# Altium PCB Drone_PCB.PcbDoc
Units mil, origin at the board's own origin, x right, y up, seen from the top; angles counter-clockwise.
Board outline 1377.95 x 1377.95 mil, 2 copper layers (Top Layer, Bottom Layer); 48 components, 24 nets, 170 pads, 30 vias.
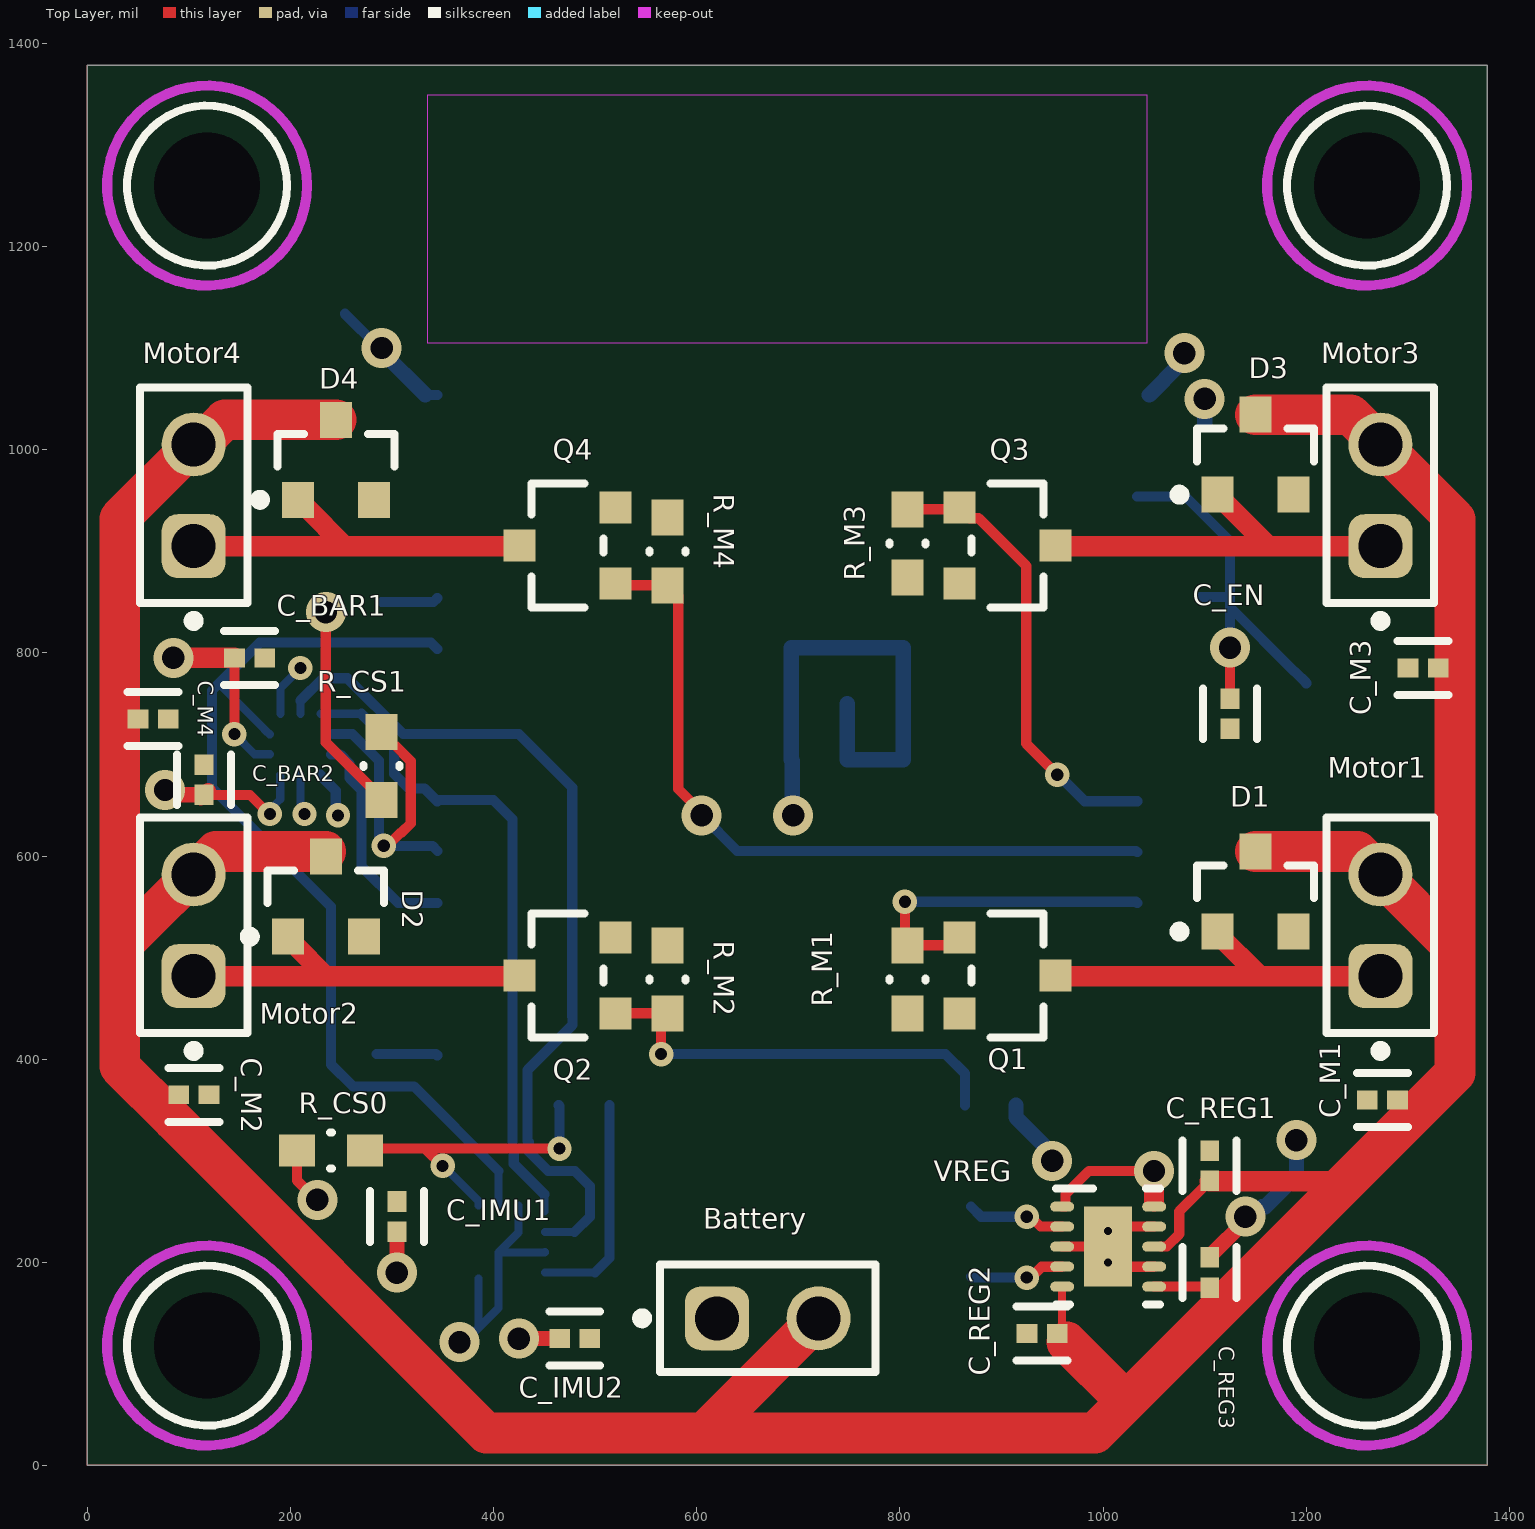
[diagram p0: Top Layer view]
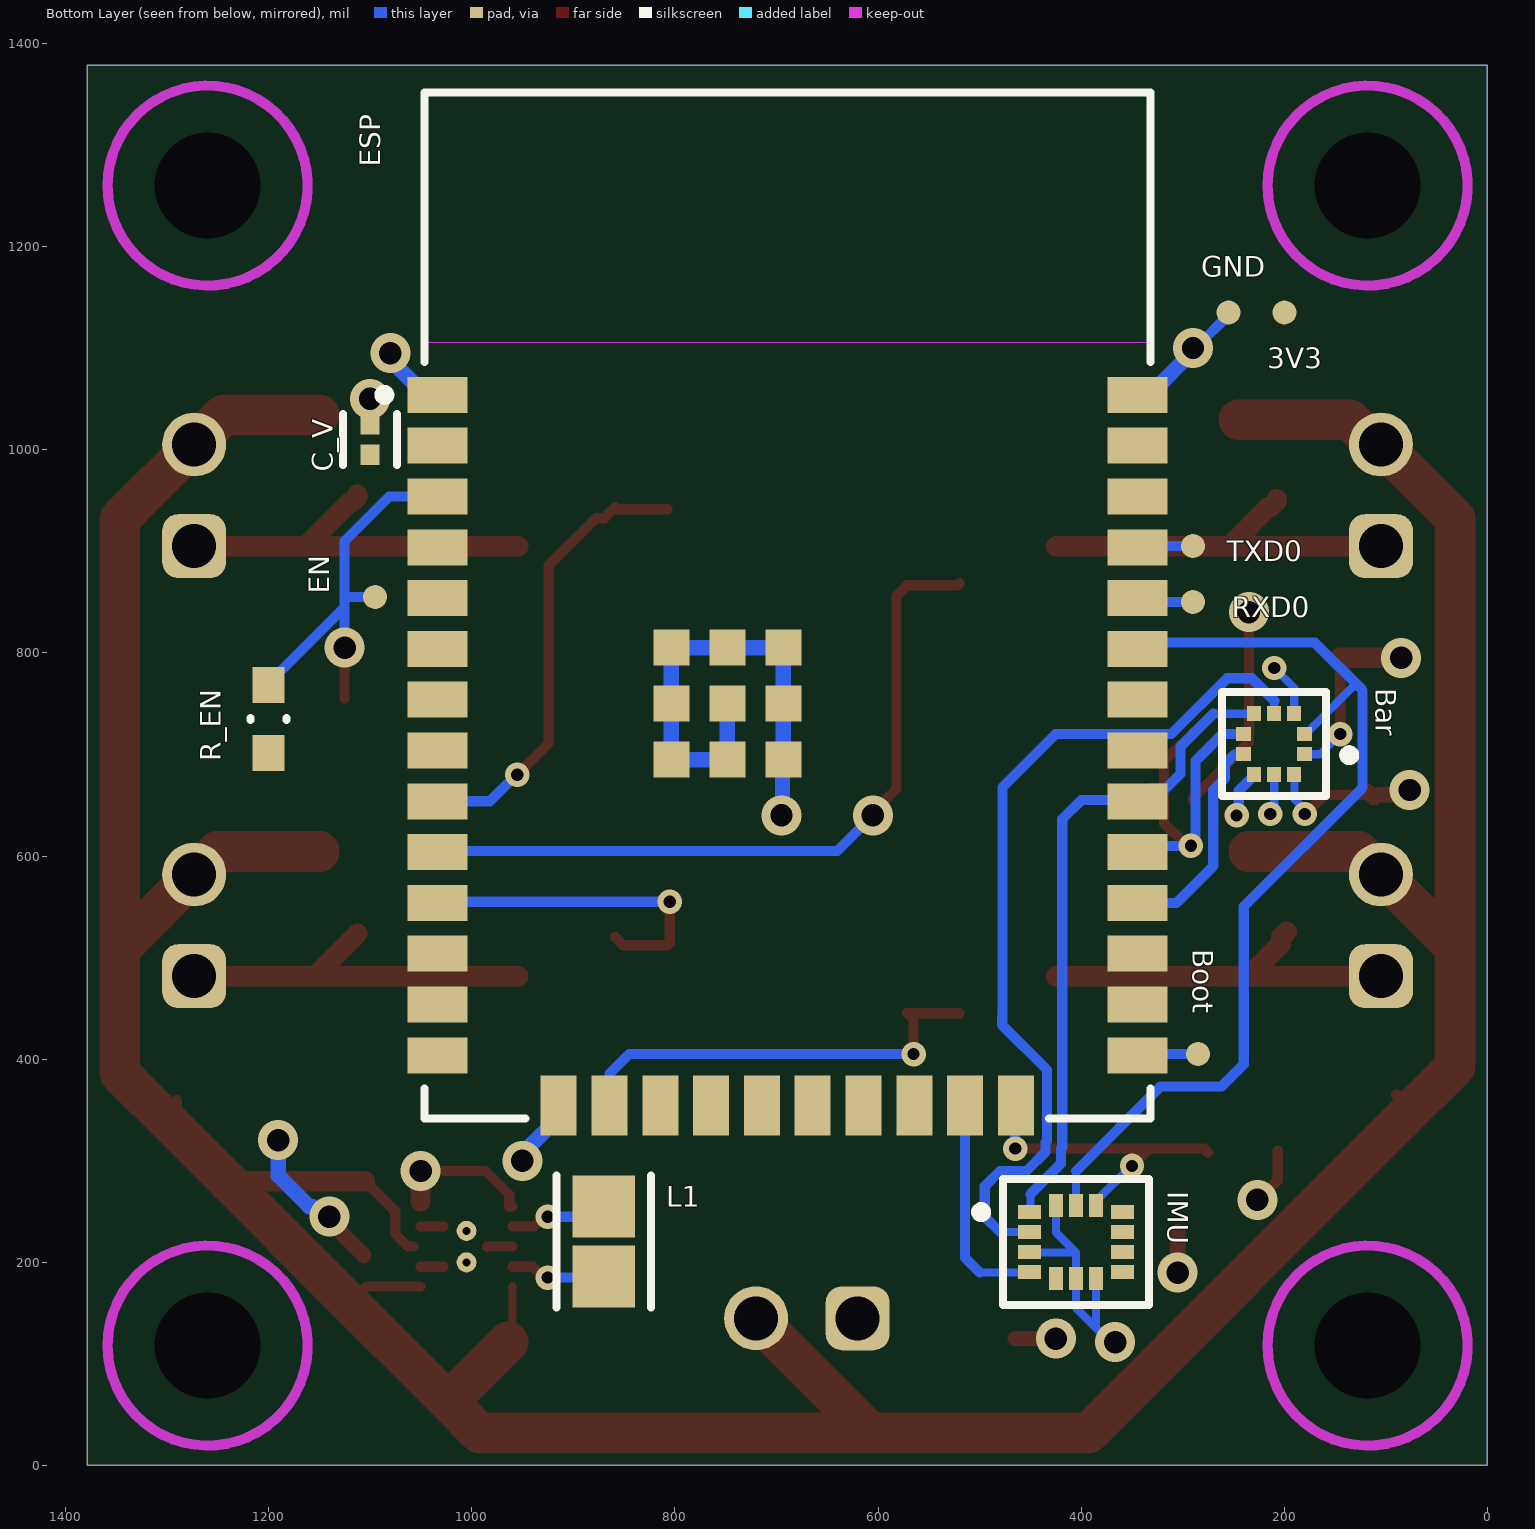
[diagram p1: Bottom Layer view, seen from below]
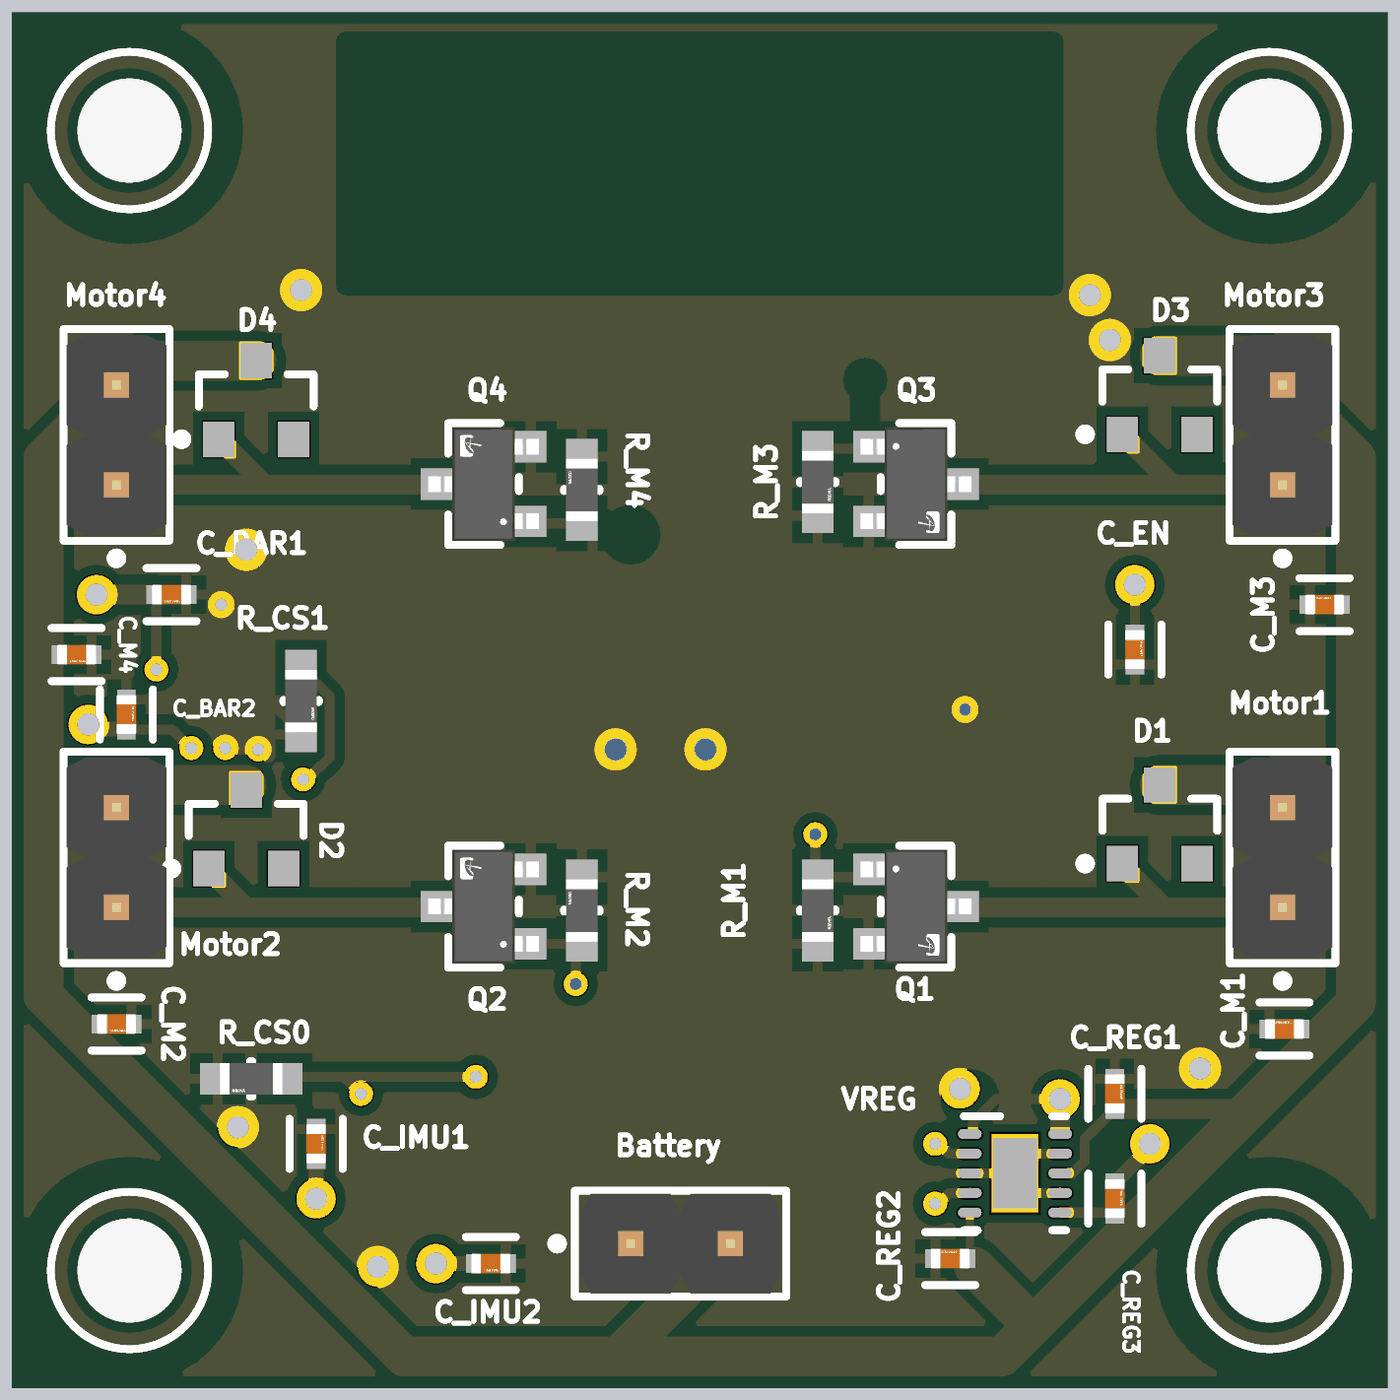
[diagram p2: 3D render of the assembled board from above, using the file's embedded part models]
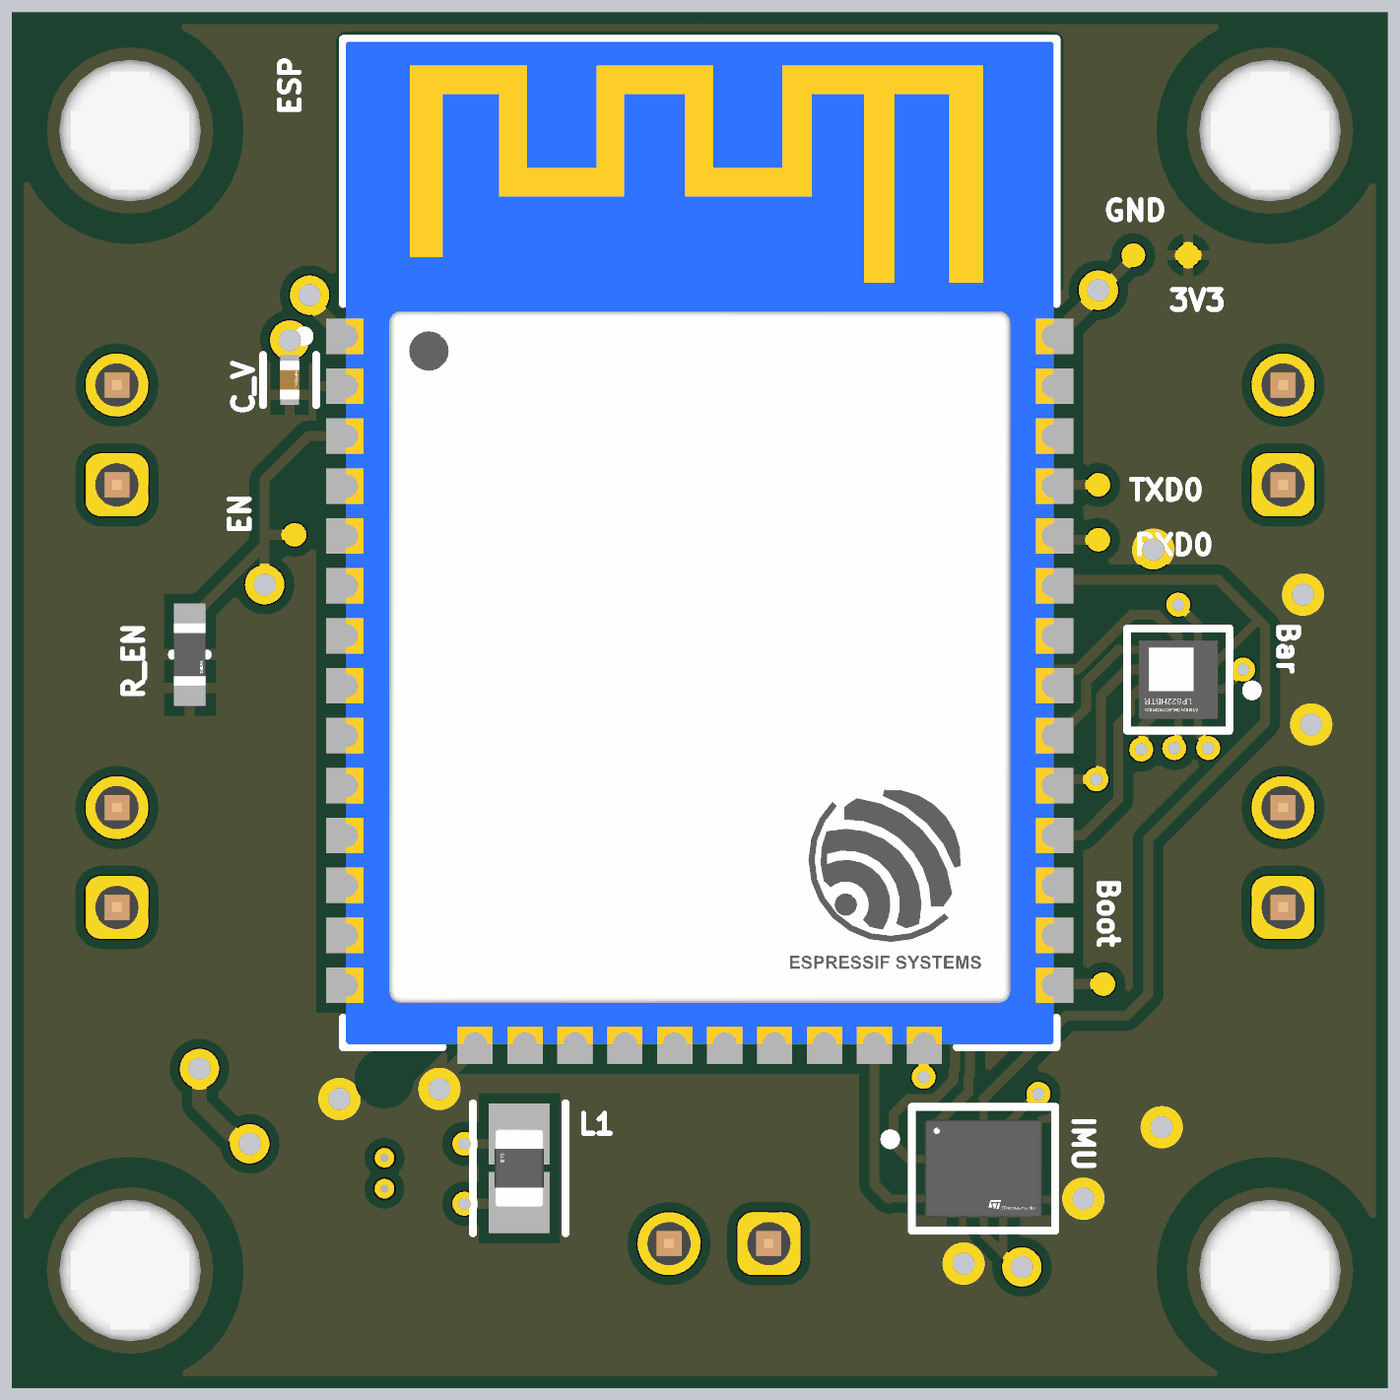
[diagram p3: 3D render of the assembled board from below, using the file's embedded part models]

## Layer stack, top to bottom
Top Solder: solder mask 0.4, Solder Resist, Dk 3.5
Top Layer: signal copper 1.4
Dielectric 1: dielectric 12.6, FR-4, Dk 4.8
Bottom Layer: signal copper 1.4
Bottom Solder: solder mask 0.4, Solder Resist, Dk 3.5

## Board outline
0.28,0.28 0.28,1378.23 1378.23,1378.23 1378.23,0.28

## Design rules (kind name [scope] priority, off if disabled: settings)
BoardOutlineClearance [All] p1: gap=11.81 ignorepadtopadclearanceinfootprint=FALSE
Clearance [All] p1: gap=5 ignorepadtopadclearanceinfootprint=TRUE except(0: Arc-Hole Track-Hole SMDPad-Hole THPad-Hole Via-Hole Fill-Hole Poly-Hole Region-Hole Text-Hole; 7.87: Arc-SMDPad Arc-THPad Track-SMDPad Track-THPad; 10: Via-Via)
Creepage [All] p1: checkdistance=10 applytopolygonpour=TRUE
HoleSize [All] p1: absolutevalues=TRUE maxlimit=248.03 minlimit=5.91 maxpercent=80.000 minpercent=20.000
MinimumAnnularRing [All] p1: minimumring=11.81
MinimumSolderMaskSliver [All] p1: minsoldermaskwidth=5.12
PlaneConnect [All] p1: pad.planeconnectstyle=Relief pad.reliefexpansion=20 pad.reliefentries=4 pad.reliefconductorwidth=10 pad.reliefairgap=10 via.planeconnectstyle=Direct via.reliefexpansion=20 via.reliefentries=4 via.reliefconductorwidth=10 via.reliefairgap=10
PolygonConnect [All] p1: thpad.connectstyle=Relief thpad.reliefconductorwidth=10 thpad.reliefentries=4 thpad.polygonreliefangle="90 Angle" thpad.airgapwidth=10 smdpad.connectstyle=Relief smdpad.reliefconductorwidth=10 smdpad.reliefentries=4 smdpad.polygonreliefangle="90 Angle" smdpad.airgapwidth=10 via.connectstyle=Direct via.reliefconductorwidth=10 via.reliefentries=4 via.polygonreliefangle="90 Angle" via.airgapwidth=10
RoutingVias [All] p1: holewidth=22.05 width=39.37 viastyle="Through Hole" minholewidth=7.87 minwidth=19.68 maxholewidth=248.03 maxwidth=275.59
SilkToSilkClearance [All] p1: silktosilkclearance=0
SilkToSolderMaskClearance [IsPad] p1: minsilkscreentomaskgap=5.91 clearancetoexposedcopper=TRUE
SolderMaskExpansion [All] p1: expansion=1.5 istentingtop=FALSE
UnConnectedPin [All] p1:
UnRoutedNet [All] p1: checkbadconnections=TRUE
Width [All] p1: maxlimit=50 minlimit=5 preferedwidth=10 minimp=50.000000 maximp=50.000000 favimp=50.000000
24 further rules are at their usual default settings.

## Classes and differential pairs
component class Drone_PCB: 3 Bar Battery C_BAR1 C_BAR2 C_EN C_IMU1 C_IMU2 C_M1 C_M2 C_M3 C_M4 C_REG1 C_REG2 C_REG3 C_V D1 D2 D3 D4 ESP IMU l L1 Motor1 Motor2 Motor3 Motor4 Q1 Q2 Q3 Q4 R_CS0 R_CS1 R_EN R_M1 R_M2 R_M3 R_M4 RXD0 TXD0 VREG

## Components (designator, comment, footprint, x,y, rotation, side; value= is the part's Value field where it differs from the comment)
3V3 "" TP06R 200,1135 r90 bottom
Bar "LPS22HBTR" FP-HLGA-10L-8479831-0 210,710 r0 bottom (schematic designator Barometer)
Battery "" 61300211121 670,145 r0 top
Boot "" TP06R 285,405 r90 bottom
C_BAR1 "" FP-CL93-IPC_C 160.1,795 r0 top
C_BAR2 "" FP-CL93-IPC_C 115,675 r90 top
C_EN "" FP-CL93-IPC_C 1125,740 r90 top
C_IMU1 "" FP-CL93-IPC_C 305,245 r90 top
C_IMU2 "" FP-CL93-IPC_C 480,125 r0 top
C_M1 "" FP-CL93-IPC_C 1274.9,360 r180 top
C_M2 "" FP-CL93-IPC_C 105.1,365 r0 top
C_M3 "" FP-CL93-IPC_C 1315.1,785 r180 top
C_M4 "" FP-CL93-IPC_C 65.1,735 r0 top
C_REG1 "" FP-CL93-IPC_C 1105,190.1 r90 top
C_REG2 "" FP-CL93-IPC_C 940.1,130 r180 top
C_REG3 "" FP-CL93-IPC_C 1105,295.1 r90 top
C_V "" FP-CL93-IPC_C 1100,1010 r90 bottom
D1 "BAT54LT1G" ONSC-SOT-23-3-318-08_V 1150,565 r90 top
D2 "BAT54LT1G" ONSC-SOT-23-3-318-08_V 235,560 r90 top
D3 "BAT54LT1G" ONSC-SOT-23-3-318-08_V 1150,995 r90 top
D4 "BAT54LT1G" ONSC-SOT-23-3-318-08_V 245,990 r90 top
EN "" TP06R 1095,855 r90 bottom
ESP "ESP32-WROOM-32E (16MB)" FP-ESP32-WROOM-32E_16MB-MFG 689.25,846.73 r180 bottom locked
GND "" TP06R 255,1135 r90 bottom
IMU "LSM6DSMTR" FP-LGA-14L-DM00249496-MFG 405,220 r180 bottom
L1 "" FP-MLZ2012-1_25-IPC_A 870,220.52 r90 bottom
MH1 "MPMS0020012PH" BF-MPMS0020012PH 1259.84,118.11 r0 top
MH2 "MPMS0020012PH" BF-MPMS0020012PH 118.11,118.11 r0 top
MH3 "MPMS0020012PH" BF-MPMS0020012PH 1259.84,1259.84 r0 top
MH4 "MPMS0020012PH" BF-MPMS0020012PH 118.11,1259.84 r0 top
Motor1 "" 61300211121 1273,531.77 r90 top
Motor2 "" 61300211121 105,531.77 r90 top
Motor3 "" 61300211121 1273,955 r90 top
Motor4 "" 61300211121 105,955 r90 top
Q1 "AO3400A" FP-SOT23-MFG 905.79,482.56 r0 top
Q2 "AO3400A" FP-SOT23-MFG 472.72,482.56 r180 top
Q3 "AO3400A" FP-SOT23-MFG 905.79,905.79 r0 top locked
Q4 "AO3400A" FP-SOT23-MFG 472.72,905.79 r180 top locked
R_CS0 "" FP-RC0603-0_55-MFG 240,310 r180 top
R_CS1 "" FP-RC0603-0_55-MFG 290,688.46 r270 top
R_EN "" FP-RC0603-0_55-MFG 1200,735 r270 bottom
R_M1 "" FP-RC0603-0_55-MFG 807.36,478.62 r270 top locked
R_M2 "" FP-RC0603-0_55-MFG 571.14,478.62 r90 top locked
R_M3 "" FP-RC0603-0_55-MFG 807.36,907.76 r270 top
R_M4 "" FP-RC0603-0_55-MFG 571.14,899.88 r90 top
RXD0 "" TP06R 290,850 r90 bottom
TXD0 "" TP06R 290,905 r90 bottom
VREG "TPS63031DSKR" DSK0010A 1005,215.5 r0 top

## Footprints (in the part's own frame and the unit in brackets; to place one, negate y for a bottom-side part, rotate by r counter-clockwise, add the part's x,y. Pads: shape width x height; smd on the part's side, far side on the other; paste and mask are expansions set on the pad)
61300211121 [mm] "Pin Header, pitch 2.54 mm, THT, Vertical, single row, 2p"
  rrect50% 1.6x1.6 hole 1.1: 1(-1.27,0)
  round 1.6 hole 1.1: 2(1.27,0)
  silkscreen extent -3.26,-1.35 2.69,1.35, body extent -2.54,-1.27 2.54,1.27, height 8.57
BF-MPMS0020012PH [mm] "Copper Pillar 9mm, M2 Screw"
  round 1 hole 2.65 unplated: 1(0,0)
  silkscreen extent -2,-2 2,2, body extent -1.85,-1.85 1.85,1.85, height 11.99
DSK0010A [mm]
  oval 0.6x0.25 smd paste+0 mask+0.051: 1(-1.15,1) 2(-1.15,0.5) 3(-1.15,0) 4(-1.15,-0.5) 5(-1.15,-1) 6(1.15,-1) 7(1.15,-0.5) 8(1.15,0) 9(1.15,0.5) 10(1.15,1)
  rect 1.2x2 smd paste-0.6 mask+0.051: 11(0,0)
  round 0.5 hole 0.203 paste-0.25 mask+0.051: V(0,-0.394) V(0,0.394)
  silkscreen extent -1.3,-1.45 1.3,1.45
FP-CL93-IPC_C [mil]
  rect 20.29x18.6 smd paste+0 mask+0: 1(-14.9,0) 2(14.9,0)
  silkscreen extent -25,-27 25,27, body extent -20,-10 20,10, height 22
FP-ESP32-WROOM-32E_16MB-MFG [mm]
  rect 1.5x0.9 smd paste+0 mask+0: 1(-8.75,5.26) 2(-8.75,3.99) 3(-8.75,2.72) 4(-8.75,1.45) 5(-8.75,0.18) 6(-8.75,-1.09) 7(-8.75,-2.36) 8(-8.75,-3.63) 9(-8.75,-4.9) 10(-8.75,-6.17) 11(-8.75,-7.44) 12(-8.75,-8.71) 13(-8.75,-9.98) 14(-8.75,-11.25) 25(8.75,-11.25) 26(8.75,-9.98) 27(8.75,-8.71) 28(8.75,-7.44) 29(8.75,-6.17) 30(8.75,-4.9) 31(8.75,-3.63) 32(8.75,-2.36) 33(8.75,-1.09) 34(8.75,0.18) 35(8.75,1.45) 36(8.75,2.72) 37(8.75,3.99) 38(8.75,5.26)
  rect 0.9x1.5 smd paste+0 mask+0: 15(-5.715,-12.5) 16(-4.445,-12.5) 17(-3.175,-12.5) 18(-1.905,-12.5) 19(-0.635,-12.5) 20(0.635,-12.5) 21(1.905,-12.5) 22(3.175,-12.5) 23(4.445,-12.5) 24(5.715,-12.5)
  rect 0.9x0.9 smd paste+0 mask+0: 39(-2.9,-3.86) 39(-2.9,-2.46) 39(-2.9,-1.06) 39(-1.5,-3.86) 39(-1.5,-2.46) 39(-1.5,-1.06) 39(-0.1,-3.86) 39(-0.1,-2.46) 39(-0.1,-1.06)
  Keep-Out Layer region: -9,12.75 9,12.75 9,6.56 -9,6.56
  silkscreen extent -10.2,-12.83 9.08,12.83, body extent -9,-12.75 9,12.75, height 3.25
FP-HLGA-10L-8479831-0 [mm]
  rect 0.375x0.35 smd paste+0 mask+0: 1(-0.763,0.25) 2(-0.763,-0.25) 6(0.763,-0.25) 7(0.763,0.25)
  rect 0.35x0.375 smd paste+0 mask+0: 3(-0.5,-0.763) 4(0,-0.763) 5(0.5,-0.763) 8(0.5,0.763) 9(0,0.763) 10(-0.5,0.763)
  silkscreen extent -2,-1.3 1.3,1.3, body extent -1,-1 1,1, height 0.8
FP-LGA-14L-DM00249496-MFG [mm]
  rect 0.575x0.35 smd paste+0 mask+0: 1(-1.162,0.75) 2(-1.162,0.25) 3(-1.162,-0.25) 4(-1.162,-0.75) 8(1.162,-0.75) 9(1.162,-0.25) 10(1.162,0.25) 11(1.162,0.75)
  rect 0.35x0.575 smd paste+0 mask+0: 5(-0.5,-0.913) 6(0,-0.913) 7(0.5,-0.913) 12(0.5,0.913) 13(0,0.913) 14(-0.5,0.913)
  silkscreen extent -2.5,-1.58 1.83,1.58, body extent -1.5,-1.25 1.5,1.25, height 0.86
FP-MLZ2012-1_25-IPC_A [mil]
  rect 61.2x61.27 smd paste+0 mask+0: 1(-34.48,0) 2(34.48,0)
  silkscreen extent -65,-46 65,46, body extent -39,-25 39,25, height 57
FP-RC0603-0_55-MFG [mm]
  rect 0.9x0.8 smd paste+0 mask+0: 1(-0.85,0) 2(0.85,0)
  silkscreen extent -0.03,-0.45 0.03,0.45, body extent -0.8,-0.4 0.8,0.4, height 0.55
FP-SOT23-MFG [mm]
  rect 0.8x0.8 smd paste+0 mask+0: 1(-1.2,0.95) 2(-1.2,-0.95) 3(1.2,0)
  silkscreen extent -0.9,-1.55 0.9,1.55, body extent -1.7,-1.78 1.7,1.78, height 0.25
ONSC-SOT-23-3-318-08_V [mm] "SOT23, 3-Leads, Body 2.92x1.3mm, Pitch 0.95mm"
  rect 0.9x0.8 smd: 1(-1,0.95) 2(-1,-0.95) 3(1,0)
  silkscreen extent -1.12,-1.46 0.65,2.02, body extent -0.65,-1.46 0.65,1.46, height 1.11
TP06R [mm] "Testpoint, round, d=0.6mm"
  round 0.6 smd paste-1: 1(0,0)

## Part data
3V3 Boot EN GND RXD0 TXD0: library part CMP-00028-00002-2, "0.6mm round", Pins=1
Bar: library part CMP-12182-000004-1, "MEMS NANO PRESSURE SENSOR: 260-1", Manufacturer=STMicroelectronics, Max Supply Voltage=3.6V, Min Supply Voltage=1.7V, Operating Supply Current=3-12uA, Package=HLGA-10L-8479831, Temperature="-40°C to +85°C", Temperature Range High=+85°C, Temperature Range Low=-40°C, Automotive=No, Category=IC, ComponentLink2Description=Datasheet, ComponentLink2URL=https://www.st.com/resource/en/datasheet/lps22hb.pdf, Device Class L1=Sensors, Device Class L2="Pressure Sensors", Device Class L3=unset, Digikey Description="MEMS NANO PRESSURE SENSOR: 260-1", Footprint Url=https://www.st.com/content/ccc/resource/technical/document/technical_note/73/17/9c/16/dd/96/4a/01/CD00134799.pdf/files/CD00134799.pdf/jcr:content/translations/en.CD00134799.pdf, Height=0.8mm, Lead Free=Yes, Manufacturer Part Number=LPS22HBTR, Octopart=https://octopart.com/lps22hbtr-stmicroelectronics-51851131, Port Style="No Port", RoHS=TRUE, Sensor Output=I2C,SPI
Battery Motor1 Motor2 Motor3 Motor4: library part CMP-1712-00002-7, "THT Vertical Pin Header WR-PHD, Pitch 2.54 mm, Single Row, 2 pins", Color=Black, Contact Resistance=20mΩ, Current Rating=3A, Max Operating Temperature=105°C, Min Operating Temperature=-40°C, Operating Supply Voltage=250V, Connector Type="Male Pin", Contact Gender=Male, Contact Material=Gold, Contact Mating Length=5.9944mm, Contact Plating=Gold, Gender=Male, Height=8.94mm, Housing Material=PBT, Lead Free="Lead Free", Lead Pitch=2.54mm, Mount="Through Hole", Number of Contacts=2, Number of Pins=2, Number of Positions=2, Number of Rows=1, Orientation=Vertical, Packaging=Bulk, Pitch=2.54mm, REACH SVHC=No, RoHS=Compliant, Termination="Through Hole", Voltage Rating=250V
C_BAR1 C_BAR2 C_EN C_IMU1 C_IMU2 C_M1 C_M2 C_M3 C_M4 C_REG1 C_REG2 C_REG3 C_V: library part CMP-13271-000610-1, "Cap Ceramic 100nF 10V X7R ±10% SMD 0402 +125°C Paper T/R"
D1 D2 D3 D4: library part CMP-1055-00534-1, "Schottky Barrier Diode, 3-Pin SOT-23, Pb-Free, Tape and Reel", Manufacturer="On Semiconductor", ComponentLink1Description="Manufacturer URL", ComponentLink1URL=http://www.onsemi.com/, ComponentLink2Description=Datasheet, ComponentLink2URL=http://www.onsemi.cn/pub_link/Collateral/BAT54LT1-D.PDF, ComponentLink3Description="Package Specification", ComponentLink3URL=http://www.onsemi.cn/pub_link/Collateral/318-08.PDF, Configuration=Single, DatasheetVersion="Rev. 12", IFSM Max (A)=0.6, Mounting Technology="Surface Mount", PackageDescription="3-Pin Small Outline Transistor, Body 2.92 x 1.3 mm, Pitch 0.95 mm", PackageReference=SOT-23-3-318-08, PackageVersion="Rev. AP, 11/2009", Packing="Tape and Reel", PartNumber=BAT54LT1G, RoHS=TRUE, trr Max (ns)=5
ESP: library part CMP-194065-000027-1, "RX TXRX MOD WIFI TRACE ANT SMD"
IMU: library part CMP-12177-000008-1, "IMU ACCEL/GYRO I2C/SPI 14LGA", Manufacturer=STMicroelectronics, Max Supply Voltage=3.6V, Min Supply Voltage=1.62V, Operating Supply Current=0.29-0.65mA, Package=LGA-14L-DM00249496, Temperature="-40°C to +85°C", Temperature Range High=+85°C, Temperature Range Low=-40°C, Accel Range=2/4/8/16g, Automotive=No, Category=IC, ComponentLink2Description=Datasheet, ComponentLink2URL=https://www.st.com/resource/en/datasheet/lsm6dsm.pdf, Device Class L1=Sensors, Device Class L2="Motion Sensors", Device Class L3="Inertial Measurement Units (IMUs)", Digikey Description="IMU ACCEL/GYRO I2C/SPI 14LGA", Footprint Url=https://www.st.com/content/ccc/resource/technical/document/technical_note/73/17/9c/16/dd/96/4a/01/CD00134799.pdf/files/CD00134799.pdf/jcr:content/translations/en.CD00134799.pdf, Gyro Range=125/250/500/1000/2000°/s, Height=0.86mm, Lead Free=Yes, Manufacturer Part Number=LSM6DSMTR, Mouser Description="LSM6DSM Series 3.6 V I2C/SPI 3D Accelerometer and 3D Gyroscope - LGA-14", Octopart=https://octopart.com/lsm6dsmtr-stmicroelectronics-66358194, Resolution=16bits, RoHS=TRUE, Sensor Output=I2C,SPI, Sensor Type=Temperature,Accelerometer,Gyroscope
L1: library part CMP-08253-000093-1, "Shielded Multilayer Inductor 2.2uH ±20% 600mA 208mΩ SMD 0805", Case Code (Imperial)=0805, Case Code (Metric)=2012, Current Rating=600mA, DC Resistance (DCR)=208mR, Inductance=2.2uH, Max Operating Temperature=125°C, Min Operating Temperature=-55°C, Package Quantity=2000, Saturation Current=400mA, Self Resonant Frequency=100MHz, Test Frequency=2MHz, Tolerance=20%, Case/Package=0805, Core Material=Ferrite, Height - Seated (Max)=0.041inch, Lead Free="Lead Free", Length=0.079inch, Mount="Surface Mount", Packaging="Tape and Reel", RoHS Compliant=Yes, Shielding=Shielded, Width=0.049inch
MH1 MH2 MH3 MH4: library part CMP-00028-00000-2, "Copper Pillar, M2 Screw", Manufacturer="B&F Fastener Supply", Package Description="1-Pin Surface Mount Device, Diameter 3.7 mm", Case/Package=MPMS0020012PH, Datasheet URL=https://datasheet.ciiva.com/1034/metd7985a-1034196.pdf, Datasheet Version=42095, Drive Type=Phillips, Manufacturer URL=http://www.bffastenersupply.com/, Mounting Technology=TH, Package Reference=MPMS0020012PH, Pins=1, RoHS Compliant=False, Screw Head Type=PanHead, Thread Size=M2, TYPE=MachineScrew
Q1 Q2 Q3 Q4: library part CMP-83955-000006-1, "MOSFET N-CH 30V 5.7A SOT23", Case/Package=SOT-23, Continuous Drain Current (ID)=5.7A, Drain to Source Voltage (Vdss)=30V, Gate to Source Voltage (Vgs)=12V, Input Capacitance=630pF, Max Operating Temperature=150°C, Max Power Dissipation=1.4W, Min Operating Temperature=-55°C, Lead Free="Lead Free", Mount="Surface Mount", Number of Elements=1, Number of Pins=3, Packaging="Tape and Reel", Power Dissipation=1.4W, Radiation Hardening=No, Rds On Max=26.5mR
R_CS0 R_CS1 R_EN R_M1 R_M2 R_M3 R_M4: library part CMP-2100-03662-2, "RES SMD 100K OHM 1% 1/10W 0603", Case Code (Imperial)=0603, Case Code (Metric)=1608, Max Operating Temperature=155°C, Max Power Dissipation=100mW, Min Operating Temperature=-55°C, Resistance=100kR, Resistance Tolerance=1%, Resistor Type="Thick Film", Temperature Coefficient=100ppm/°C, Voltage Rating=50V, Working Voltage=75V, Case/Package=0603, Construction=Rectangular, Depth=0.8mm, Features="Moisture Resistant", Height=0.45mm, Lead Free="Lead Free", Length=1.6mm, Military Standard=Not, Number of Pins=2, Number of Terminations=2, Packaging="Tape and Reel", Power Rating=100mW, REACH SVHC="No SVHC", RoHS Compliant=Yes, Series=RC, Technology="THICK FILM", Termination=SMD/SMT, Tolerance=1%, Voltage Rating (DC)=50V, Width=0.8mm
VREG: library part CMP-006-00021-1, "High Efficient Single Inductor Buck-Boost Converter with 1-A Switches 10-SON -40 to 125", Alternate_PartNumber=TPS63031DSKT, Case/Package=DSK0010A, Manufacturer="Texas Instruments", CompType=IC, Copyright="Copyright (C) 2026 Ultra Librarian. All rights reserved.", Design Item ID=TPS63031DSKR, Manufacturer_Name="Texas Instruments", Manufacturer_Part_Number=TPS63031DSKR, MountType=SMT, PartNumber=TPS63031DSKR, RefDes=RefDes, RoHS=Y, Source=TPS63031DSKR.SchLib, TYPE=TYPE

## Via types
v1: diameter 39.37, hole 22.05, Top Layer to Bottom Layer, 17 vias
v2: diameter 24, hole 12, Top Layer to Bottom Layer, 13 vias

## Nets (pads, with @x,y where several pads share a name; then routed paths per layer and width w, separated by ;. In a path a pad name is that pad's centre, name@x,y a point inside that pad or via, vN(x,y) a via of type N, cw(c..) or ccw(c..) an arc to the next point about the centre after c; other vN are vias at no path point)
3V3: 3V3.1 Bar.1 Bar.10 C_BAR1.1 C_BAR2.1 C_IMU1.1 C_IMU2.1 C_V.1 ESP.2 IMU.5 IMU.8 R_CS0.2 R_CS1.2 R_EN.2 VREG.1 VREG.10 | length 823.7
  Top Layer w10: C_BAR2.1@117.57,660 160.45,660 179.08,641.37 v2(180,641.37) ; v2(145,720) C_BAR1.1@145,794.3 ; C_BAR1.1 145,794.81 C_BAR1.1@145,794.3 ; C_BAR1.1@145.7,795 C_BAR1.1@145,794.3 ; R_CS0.2 206.54,280.72 225.66,261.6 v1(226.6,261.6) ; v1(235,840) 235,711.97 290,656.97 R_CS1.2 ; VREG.1 962.88,254.87 962.96,254.95 962.96,266.81 986.06,289.91 v1(1050.19,289.91)
  Top Layer w15: v1(76.77,665) 81.43,660.34 C_BAR2.1@108.7,660.34 ; C_BAR2.1@112.02,657.02 C_BAR2.1@119.39,664.39 ; v1(305,190) C_IMU1.1 ; v1(425,125) C_IMU2.1
  Top Layer w20: v1(85,795) C_BAR1.1 ; v1(1050.19,289.91) v1(1050.19,289.91) 1050.23,259.95
  Bottom Layer w8: v2(145,720) 164.84,700.16 Bar.1 ; v2(180,641.37) 180,645.7 190.16,655.86 Bar.10@190.16,679.82
BAR_INT: Bar.7 ESP.28 | length 217.5
  Bottom Layer w10: Bar.7@240,700 249.09,700 258.36,690.73 258.36,676.64 270,665 270,590 306.09,553.91 344.68,553.91 ESP.28
CS0: ESP.24 IMU.12 R_CS0.1 | length 312.1
  Top Layer w10: R_CS0.1@275.46,308.24 279.23,312 333,312 ; v2(350,295) 333,312 ; v2(465,312) 333,312
  Bottom Layer w8: v2@350.67,295 385.32,260.35 IMU.12
  Bottom Layer w10: v2(350,295) v2@350.67,295 ; ESP.24 465,353.86 v2(465,312)
CS1: Bar.6 ESP.29 R_CS1.1 | length 336.5
  Top Layer w10: R_CS1.1 290,719.96 300.75,709.21 302.72,709.21 318.62,693.31 318.62,631.95 309.89,623.22 309.01,623.22 295.79,610 v2(292,610)
  Bottom Layer w10: Bar.6@242.4,719.92 261.29,719.92 287.36,693.85 287.36,612.64 290,610 340,610 ESP.29@345,605
GND: Bar.3 Bar.8 Bar.9 Battery.1 C_BAR1.2 C_BAR2.2 C_EN.1 C_IMU1.2 C_IMU2.2 C_M1.2 C_M2.2 C_M3.2 C_M4.2 C_REG1.2 C_REG2.2 C_REG3.2 C_V.2 ESP.1 ESP.15 ESP.38 ESP.39 GND.1 IMU.3 IMU.6 IMU.7 IMU.14 Q1.2 Q2.2 Q3.2 Q4.2 R_M1.2 R_M2.2 R_M3.2 R_M4.2 VREG.3 VREG.7 VREG.9 VREG.11 | length 1393
  Top Layer w10: VREG.3 VREG.11@985,215.5 ; VREG.11@1027.5,195.74 1050.2,195.74 VREG.7 VREG.7@1050.35,195.89 ; VREG.11@1027.5,235.19 VREG.9 ; C_REG1.2 C_REG1.2@1106.46,206.46
  Top Layer w15: C_REG1.2@1106.46,206.46 1106.46,207.3 1140,240.84 v1(1140,245)
  Bottom Layer w8: Bar.3 190.31,765.32 v2(210,785) ; Bar.9 210,650.7 215,645.7 v2@215,641.37 ; v1@371.6,121.6 405,155 IMU.6 405,209.92 ; 385.32,138.3 IMU.7 ; IMU.14 424.68,229.61 405,209.92 ; IMU.3 450.53,209.92 405,209.92
  Bottom Layer w10: Bar.8 231.57,678.09 231.57,677.6 244.87,664.3 244.87,640.13 v2@245,640 ; GND.1@253.75,1133.75 287.5,1100 v1(290,1100) v1@290,1096.77 ; ESP.38@332.95,1053.82 ESP.38
  Bottom Layer w15: v1@290,1096.77 ESP.38@332.95,1053.82 ; v1(366.6,121.6) v1@371.6,121.6 ; v1(695,640) 694.09,640.91 694.09,693.86 693.19,694.76 693.19,749.88 693.19,805 803.43,805 803.43,749.88 803.43,694.76 748.31,694.76 ESP.39@748.31,749.88 ; ESP.15 914.25,342.79 945.34,311.71 945.34,304.66 v1(950,300) ; ESP.1@1045.55,1053.82 1075.34,1083.6 1075.34,1090.34 v1(1080,1095) ; C_V.2 v1(1100,1050) ; v1(1140,245) 1146.59,245 1156.42,254.83 1159.83,254.83 1190.34,285.34 v1(1190.34,320.34)
  other v2: 247,640 214,641.37
IMU_INT: ESP.23 IMU.4 | length 219.7
  Bottom Layer w8: IMU.4@450.77,190 500,190
  Bottom Layer w10: 500,190 514.25,204.25 ESP.23
M1: ESP.11 Q1.1 R_M1.1 | length 327.6
  Top Layer w10: v2(805,555) 805,514.45 R_M1.1 850.67,512.09 Q1.1
  Bottom Layer w10: v2(805,555) 1032.56,555 ESP.11
M2: ESP.16 Q2.1 R_M2.1 | length 432.3
  Top Layer w10: Q2.1 R_M2.1 565,439.02 v2(565,405)
  Bottom Layer w10: v2(565,405) 845,405 864.25,385.75 ESP.16
M3: ESP.9 Q3.1 R_M3.1 | length 446.8
  Top Layer w10: R_M3.1 Q3.1@856.57,941.22 ; Q3.1 869.29,932.44 877.56,932.44 924.41,885.59 924.41,710.59 v2(955,680)
  Bottom Layer w10: v2(955,680) 955.82,680 982,653.82 ESP.9
M4: ESP.10 Q4.1 R_M4.1 | length 736.2
  Top Layer w10: Q4.1 521.93,866.42 R_M4.1 581.89,855.67 581.89,665.94 605,642.83 v1(605,640)
  Bottom Layer w10: v1(605,640) 640,605 1032.56,605 ESP.10
MISO: Bar.5 ESP.30 IMU.1 | length 647.4
  Bottom Layer w8: Bar.5@229.78,740.02 269.98,740.02 ; IMU.1@450,250 450,267.03
  Bottom Layer w10: 269.98,740.02 302.36,707.64 302.36,680.77 316.6,666.54 332.05,666.54 ESP.30 ; ESP.30@344.76,655 400,655 418.66,636.34 418.66,313.53 420,312.19 420,297.03 450,267.03
MOSI: Bar.4 ESP.31 IMU.2 | length 866.1
  Bottom Layer w8: Bar.4 210,752.81 ; IMU.2 479.84,229.84
  Bottom Layer w10: 210,752.81 232.19,775 256.21,775 311.21,720 425,720 477.6,667.4 477.6,441.95 477.73,441.82 477.73,433.53 433.66,389.47 433.66,319.75 435,318.41 435,308.89 453.89,290 480,290 495,275 495,245 479.84,229.84
NetBoot_1: Boot.1 ESP.25 | length 60.3
  Bottom Layer w10: Boot.1 343.58,405 ESP.25
NetC_EN_2: C_EN.2 EN.1 ESP.3 R_EN.1 | length 400.8
  Top Layer w10: C_EN.2 v1(1125,805)
  Bottom Layer w10: ESP.3 1081.18,953.82 1125,910 1125,855 ; EN.1 1125,855 ; v1(1125,805) 1125,845 ; R_EN.1@1200,770 1200,770.43 1189.25,781.18 1188.82,781.18 1125,845 ; 1125,845 1125,855
NetD1_1: D1.1 Motor1.1 Q1.3 | length 379.5
  Top Layer w10: Q1.3 Q1.3@953.82,481.77
  Top Layer w20: Q1.3@953.82,481.77 1154.49,481.77 ; D1.1@1112.6,523.66 1154.49,481.77 ; Motor1.1 1154.49,481.77
NetD2_1: D2.1 Motor2.1 Q2.3 | length 380.1
  Top Layer w10: Q2.3@424.68,481.77 Q2.3
  Top Layer w20: Motor2.1 235,481.77 ; D2.1@197.6,525.63 203.35,519.88 203.35,513.43 235,481.77 ; Q2.3@424.68,481.77 235,481.77
NetD3_1: D3.1 Motor3.1 Q3.3 | length 393
  Top Layer w10: Q3.3 Q3.3@953.82,905
  Top Layer w20: Q3.3@953.82,905 1163.23,905 ; D3.1 1112.6,953.66 1118.35,947.91 1120.32,947.91 1163.23,905 ; Motor3.1 1163.23,905
NetD4_1: D4.1 Motor4.1 Q4.3 | length 387.4
  Top Layer w10: Q4.3@424.68,905 Q4.3
  Top Layer w20: Motor4.1 253.86,905 ; D4.1@207.6,951.26 207.6,949.29 213.35,943.54 215.32,943.54 253.86,905 ; Q4.3@424.68,905 253.86,905
NetESP_34: ESP.34 RXD0.1 | length 56.3
  Bottom Layer w10: RXD0.1 340.94,850 ESP.34
NetESP_35: ESP.35 TXD0.1 | length 55.3
  Bottom Layer w10: TXD0.1 343.58,905 ESP.35
NetL1_1: L1.1 VREG.4 | length 94.6
  Top Layer w10: v2(925,185) 928.79,185 939.52,195.74 959.65,195.74 VREG.4
  Bottom Layer w10: L1.1 871.03,185 v2(925,185)
NetL1_2: L1.2 VREG.2 | length 97.9
  Top Layer w10: v2(925,245) 928.79,245 938.52,235.26 959.65,235.26 VREG.2
  Bottom Layer w10: L1.2 880,245 v2(925,245)
SCLK: Bar.2 ESP.33 IMU.13 | length 973.8
  Bottom Layer w8: 129.64,769.64 171.55,727.72 176.54,722.73 176.6,722.73 179.49,719.84 Bar.2 ; IMU.13 405,290
  Bottom Layer w10: ESP.33 338.58,810 170,810 123,763 123,667.26 240,550.26 240,395 261.77,373.23 321.77,373.23 405,290
VBAT: Battery.2 C_M1.1 C_M2.1 C_M3.1 C_M4.1 C_REG1.1 C_REG2.1 C_REG3.1 D1.3 D2.3 D3.3 D4.3 Motor1.2 Motor2.2 Motor3.2 Motor4.2 VREG.5 VREG.6 VREG.8 | length 4311.3
  Top Layer w8: C_REG2.1@959.72,134.3 VREG.5
  Top Layer w10: 85,340 85,359.81 85.05,359.86 85.05,360.7 89.35,365 C_M2.1 ; 1020.84,65 1025,65 ; VREG.6 1104.06,176.13 C_REG1.1 1107.69,172.5 1132.5,172.5 ; VREG.8@1057.09,215.58 1062.73,215.58 1074.96,227.81 1074.96,240.19 1075,240.22 1075,250.19 1099.86,275.05 1100.7,275.05 1105,279.35 1105,280 C_REG3.1 ; C_M1.1 1289.81,336.61 1293.21,333.21
  Top Layer w20: C_REG3.1@1105,280 1240,280
  Top Layer w40: D2.3@235,604.37 126.77,604.37 32.09,509.69 ; D4.3 135.59,1029.37 111.22,1005 Motor4.2 32.09,932.09 32.09,509.69 ; Battery.2 607.09,32.09 ; C_REG2.1@964.17,121.67 1020.84,65 ; D1.3 1250.4,604.37 Motor1.2 1339.77,515 1346.42,515 ; D3.3 1243.63,1034.37 Motor3.2 1346.42,931.58 1346.42,515 ; 32.09,509.69 32.09,392.91 85,340 392.91,32.09 607.09,32.09 ; 607.09,32.09 992.09,32.09 1025,65 1132.5,172.5 1240,280 1293.21,333.21 1346.42,386.42 1346.42,515
pads on no net: D1.2 D2.2 D3.2 D4.2 ESP.4 ESP.5 ESP.6 ESP.7 ESP.8 ESP.12 ESP.13 ESP.14 ESP.17 ESP.18 ESP.19 ESP.20 ESP.21 ESP.22 ESP.26 ESP.27 ESP.32 ESP.36 ESP.37 IMU.9 IMU.10 IMU.11 MH1.1 MH2.1 MH3.1 MH4.1 VREG.V

## Polygon pours and split planes (outlines as drawn)
GND on Top Layer "NONET_L01_P001" (solid, shelved, pour order 1): 0.28,0.28 0.28,1378.23 1378.23,1378.23 1378.23,0.28
3V3 on Bottom Layer "NONET_L02_P000" (solid, shelved, pour order 0): 0.28,0.28 0.28,1378.23 1378.23,1378.23 1378.23,0.28

## Keep-outs
Keep-Out Layer:
  circle w10: c118.11,118.11 r98.43
  circle w10: c118.11,1259.84 r98.43
  circle w10: c1259.84,1259.84 r98.43
  circle w10: c1259.84,118.11 r98.43